# Altium PCB Christmas_Tree.PcbDoc
Units mil, origin at the board's own origin, x right, y up, seen from the top; angles counter-clockwise.
Board outline 3937.01 x 4724.41 mil, 2 copper layers (Top Layer, Bottom Layer); 17 components, 10 nets, 34 pads, 0 vias.
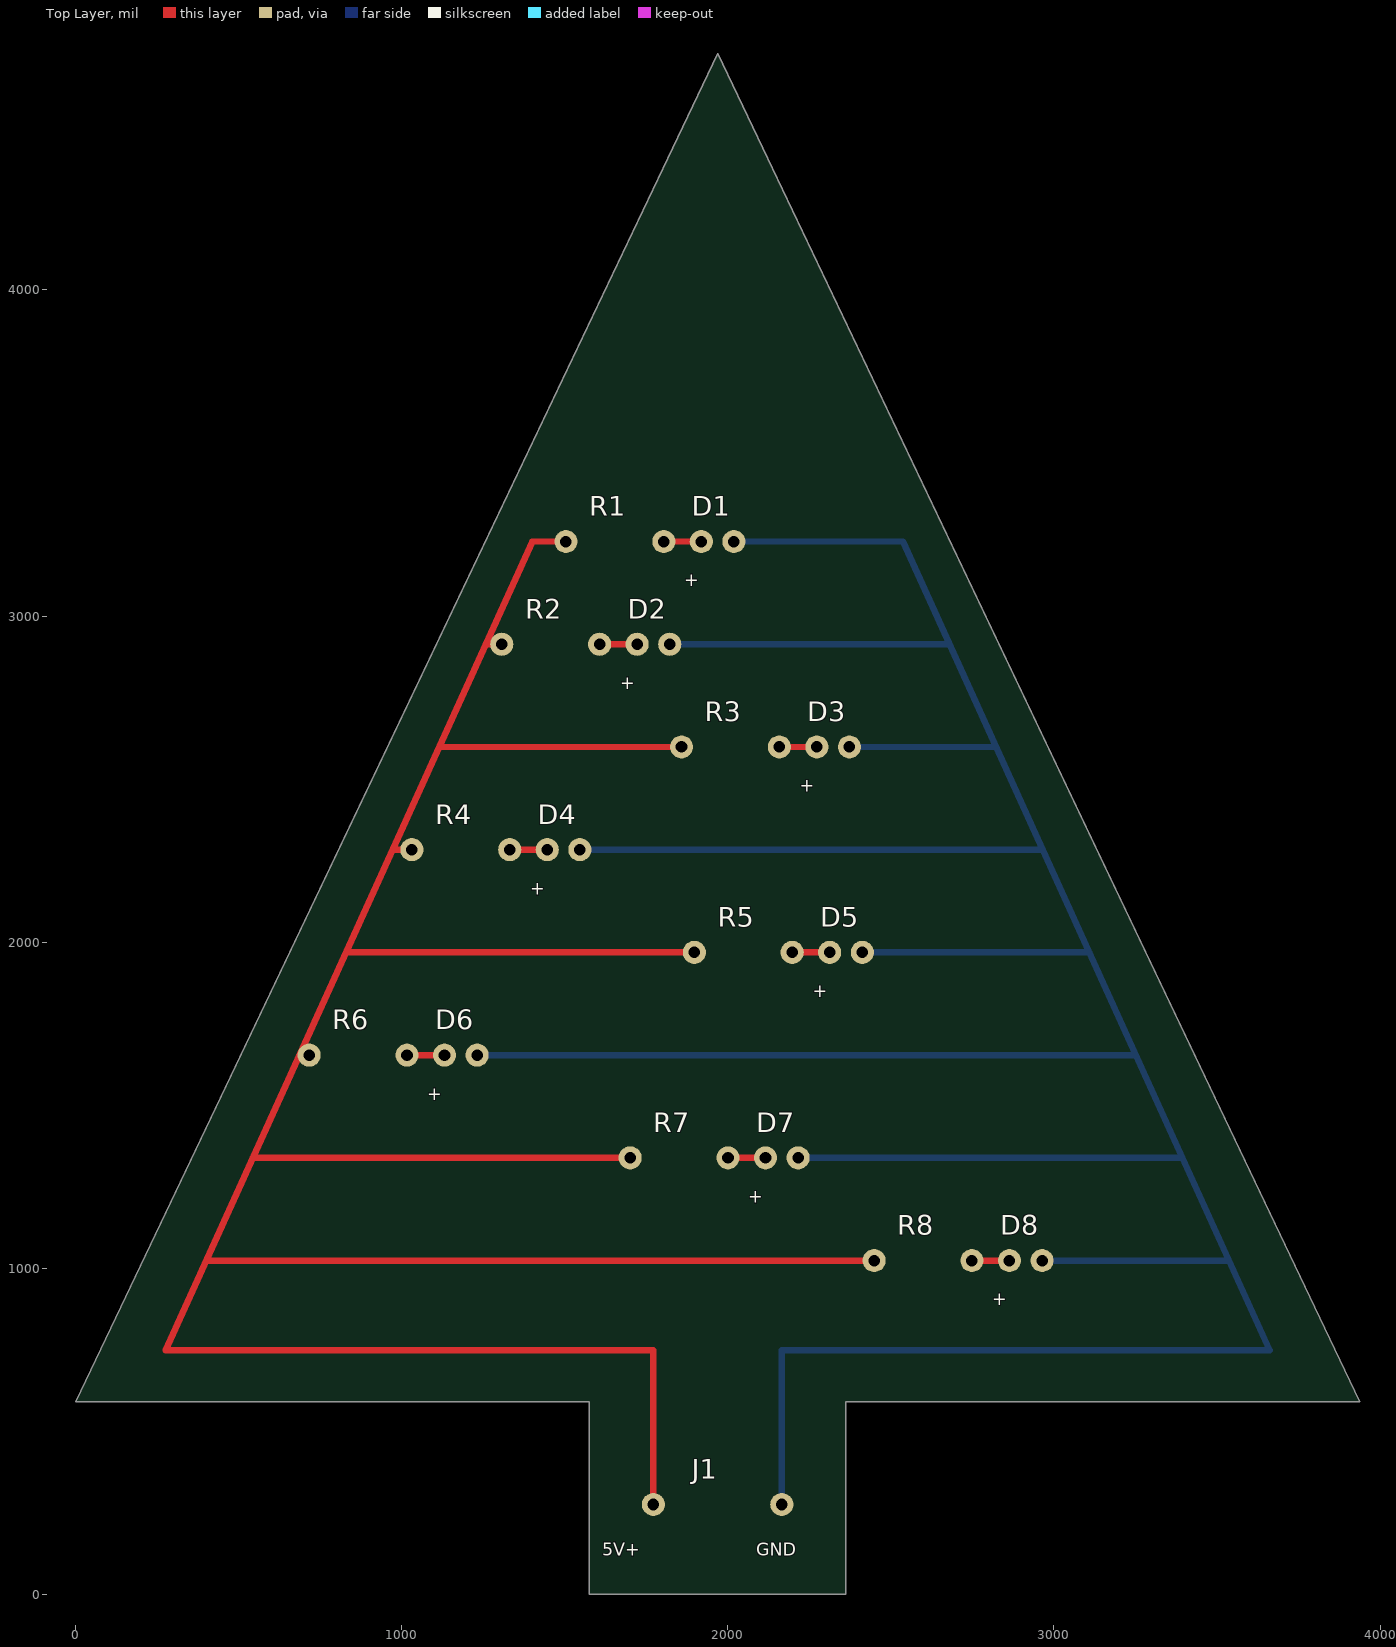
[diagram p0: Top Layer view]
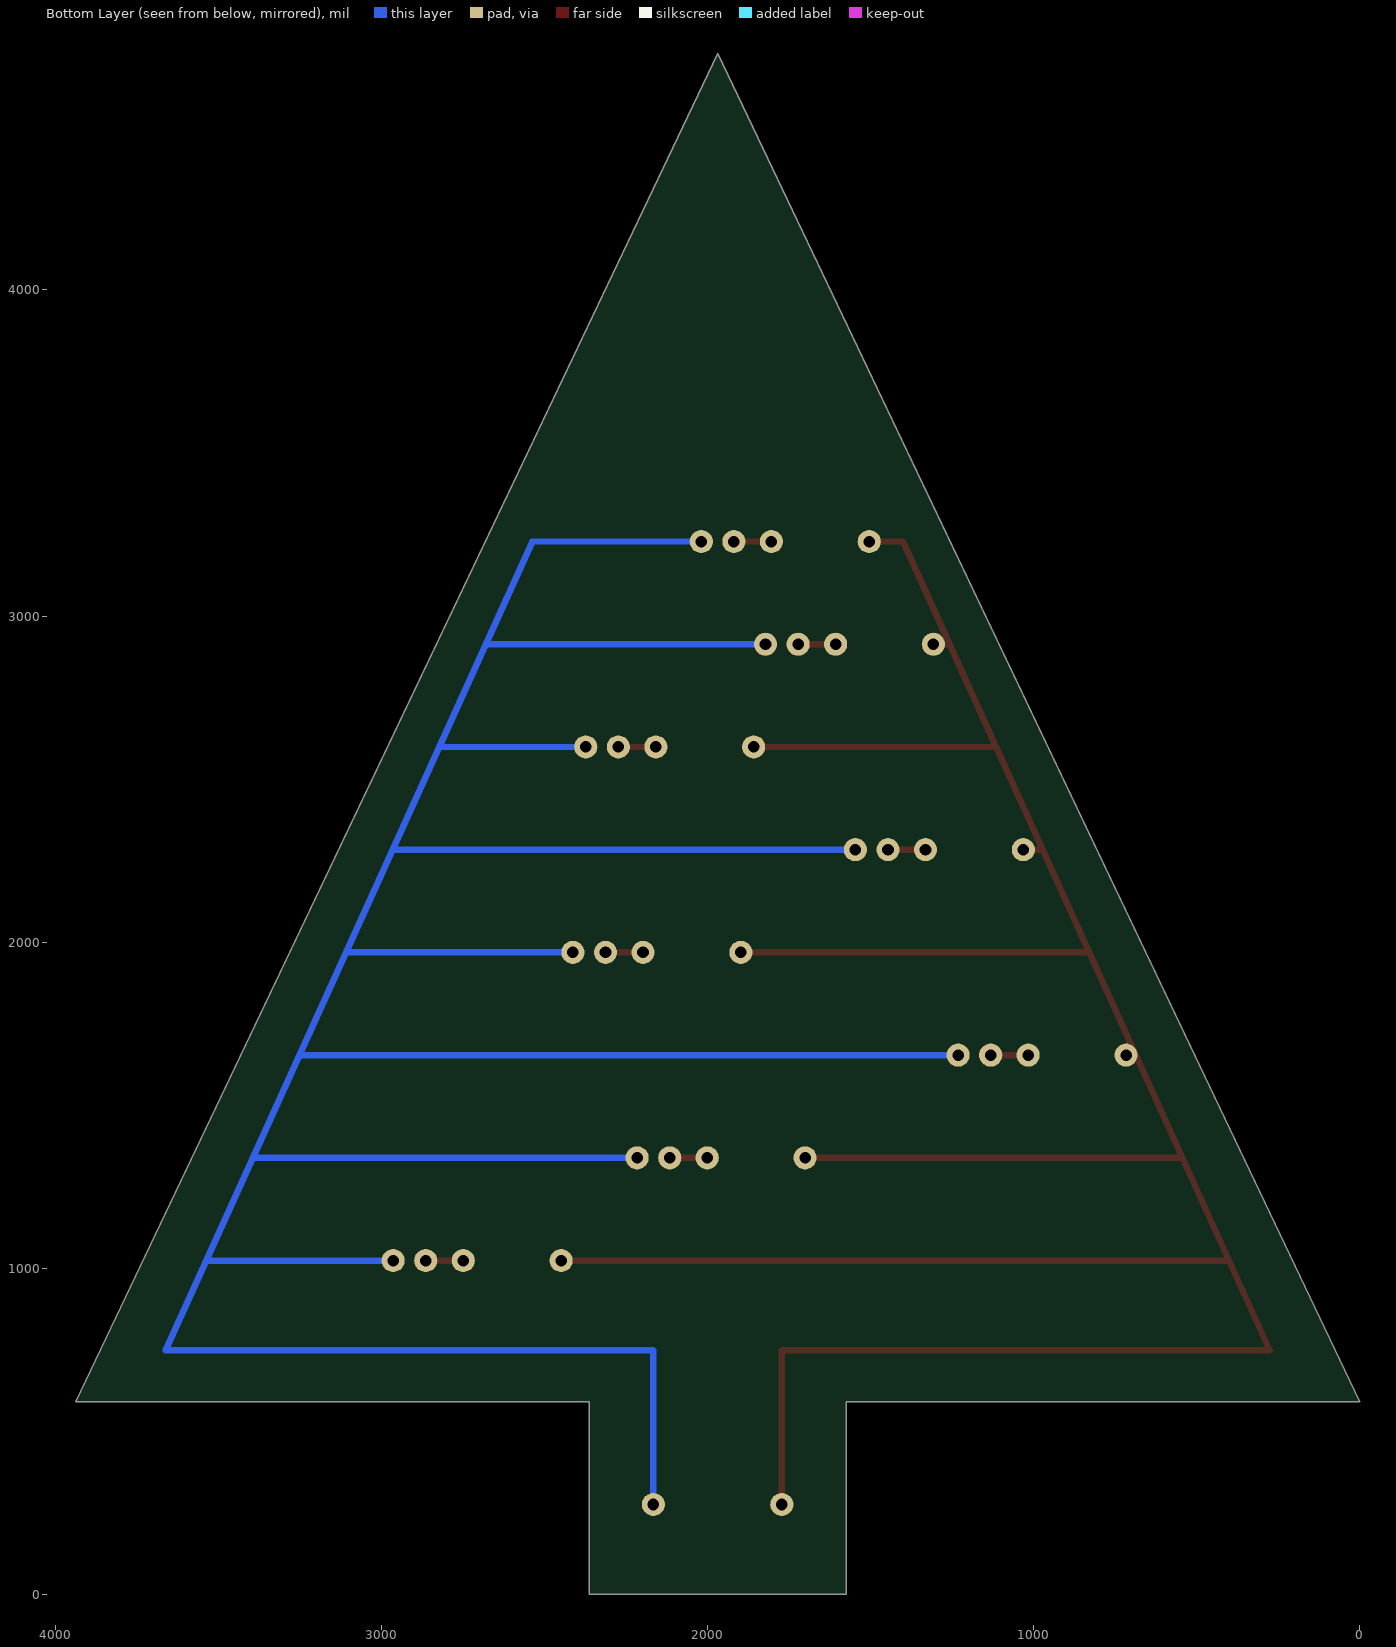
[diagram p1: Bottom Layer view, seen from below]

## Layer stack, top to bottom
Top Solder: solder mask 0.4, Solder Resist, Dk 3.5
Top Layer: signal copper 1.4
Dielectric 1: dielectric 12.6, FR-4, Dk 4.8
Bottom Layer: signal copper 1.4
Bottom Solder: solder mask 0.4, Solder Resist, Dk 3.5

## Board outline
0,590.55 1574.8,590.55 1574.8,0 2362.2,0 2362.2,590.55 3937.01,590.55 1968.5,4724.41

## Design rules (kind name [scope] priority, off if disabled: settings)
Clearance [All] p1: gap=10 ignorepadtopadclearanceinfootprint=FALSE
PolygonConnect [All] p1: connectstyle=Relief reliefconductorwidth=10 reliefentries=4 polygonreliefangle="90 Angle" airgapwidth=10
RoutingVias [All] p1: holewidth=28 width=50 viastyle="Through Hole" minholewidth=28 minwidth=50 maxholewidth=28 maxwidth=50
SolderMaskExpansion [All] p1: expansion=0 istentingtop=FALSE
Width [All] p1: maxlimit=39.37 minlimit=9.84 preferedwidth=19.68 minimp=50.000000 maximp=50.000000 favimp=50.000000
30 further rules are at their usual default settings.

## Components (designator, comment, footprint, x,y, rotation, side; value= is the part's Value field where it differs from the comment)
D1 "LED" LED_5MM_2P54 1968.5,3228.35 r0 top
D2 "LED" LED_5MM_2P54 1771.65,2913.39 r0 top
D3 "LED" LED_5MM_2P54 2322.83,2598.43 r0 top
D4 "LED" LED_5MM_2P54 1496.06,2283.46 r0 top
D5 "LED" LED_5MM_2P54 2362.2,1968.5 r0 top
D6 "LED" LED_5MM_2P54 1181.1,1653.54 r0 top
D7 "LED" LED_5MM_2P54 2165.35,1338.58 r0 top
D8 "LED" LED_5MM_2P54 2913.39,1023.62 r0 top
J1 "5V INPUT" WIRE_2P_10MM 1968.5,275.59 r0 top
R1 "330R" RES_AXIAL_7P62 1653.54,3228.35 r0 top
R2 "330R" RES_AXIAL_7P62 1456.69,2913.39 r0 top
R3 "330R" RES_AXIAL_7P62 2007.87,2598.43 r0 top
R4 "330R" RES_AXIAL_7P62 1181.1,2283.46 r0 top
R5 "330R" RES_AXIAL_7P62 2047.24,1968.5 r0 top
R6 "330R" RES_AXIAL_7P62 866.14,1653.54 r0 top
R7 "330R" RES_AXIAL_7P62 1850.39,1338.58 r0 top
R8 "330R" RES_AXIAL_7P62 2598.43,1023.62 r0 top

## Footprints (in the part's own frame and the unit in brackets; to place one, negate y for a bottom-side part, rotate by r counter-clockwise, add the part's x,y. Pads: shape width x height; smd on the part's side, far side on the other; paste and mask are expansions set on the pad)
LED_5MM_2P54 [mm]
  round 1.8 hole 0.9: 1(-1.27,0) 2(1.27,0)
RES_AXIAL_7P62 [mm]
  round 1.8 hole 0.9: 1(-3.81,0) 2(3.81,0)
WIRE_2P_10MM [mm]
  round 1.8 hole 0.9: 1(-5,0) 2(5,0)

## Part data
J1: library part CONNECTOR
R1 R2 R3 R4 R5 R6 R7 R8: library part RESISTOR

## Nets (pads, with @x,y where several pads share a name; then routed paths per layer and width w, separated by ;. In a path a pad name is that pad's centre, name@x,y a point inside that pad or via, vN(x,y) a via of type N, cw(c..) or ccw(c..) an arc to the next point about the centre after c; other vN are vias at no path point)
5V: J1.1 R1.1 R2.1 R3.1 R4.1 R5.1 R6.1 R7.1 R8.1 | length 9949.6
  Top Layer w19.68: 400.57,1023.62 R8.1 ; 543.4,1338.58 R7.1 ; R6.1@686.23,1653.54 R6.1 ; 829.06,1968.5 R5.1 ; 971.89,2283.46 R4.1 ; 1114.72,2598.43 R3.1 ; 1257.55,2913.39 R2.1 ; R1.1 1400.38,3228.35 275.59,748.03 1771.65,748.03 J1.1
GND: D1.2 D2.2 D3.2 D4.2 D5.2 D6.2 D7.2 D8.2 J1.2 | length 12403.1
  Bottom Layer w19.68: D6.2 3250.78,1653.54 ; D4.2 2965.12,2283.46 ; D2.2 2679.45,2913.39 ; D1.2 2536.62,3228.35 3661.42,748.03 2165.35,748.03 J1.2 ; D7.2 3393.61,1338.58 ; D3.2 2822.29,2598.43 ; D5.2 3107.95,1968.5 ; D8.2 3536.44,1023.62
NetD1_1: D1.1 R1.2 | length 115
  Top Layer w19.68: R1.2 D1.1
NetD2_1: D2.1 R2.2 | length 115
  Top Layer w19.68: R2.2 D2.1
NetD3_1: D3.1 R3.2 | length 115
  Top Layer w19.68: R3.2 D3.1
NetD4_1: D4.1 R4.2 | length 115
  Top Layer w19.68: R4.2 D4.1
NetD5_1: D5.1 R5.2 | length 115
  Top Layer w19.68: R5.2 D5.1
NetD6_1: D6.1 R6.2 | length 115
  Top Layer w19.68: R6.2 D6.1
NetD7_1: D7.1 R7.2 | length 115
  Top Layer w19.68: R7.2 D7.1
NetD8_1: D8.1 R8.2 | length 115
  Top Layer w19.68: R8.2 D8.1

## Silkscreen, mask and mechanical layers (free items; w line width, h text height)
Top Overlay:
  text "+" at 1866.14,3090.55 h39.37
  text "+" at 1669.29,2775.59 h39.37
  text "+" at 2220.47,2460.63 h39.37
  text "+" at 1393.7,2145.67 h39.37
  text "+" at 2259.84,1830.71 h39.37
  text "+" at 1078.74,1515.75 h39.37
  text "+" at 2062.99,1200.79 h39.37
  text "+" at 2811.02,885.83 h39.37
  text "5V+" at 1614.17,118.11 h39.37
  text "GND" at 2086.61,118.11 h39.37
Mechanical 1:
  the board outline again, w3.94